# Altium PCB PS3604LF.PcbDoc (part 1 of 2)
Units mm, origin at the board's own origin, x right, y up, seen from the top; angles counter-clockwise.
Board outline 115 x 36 mm, 2 copper layers (Top Layer, Bottom Layer), stack 1.571 mm thick; 93 components, 88 nets, 378 pads, 83 vias.
Unrouted connection lines stored in the file: 6.
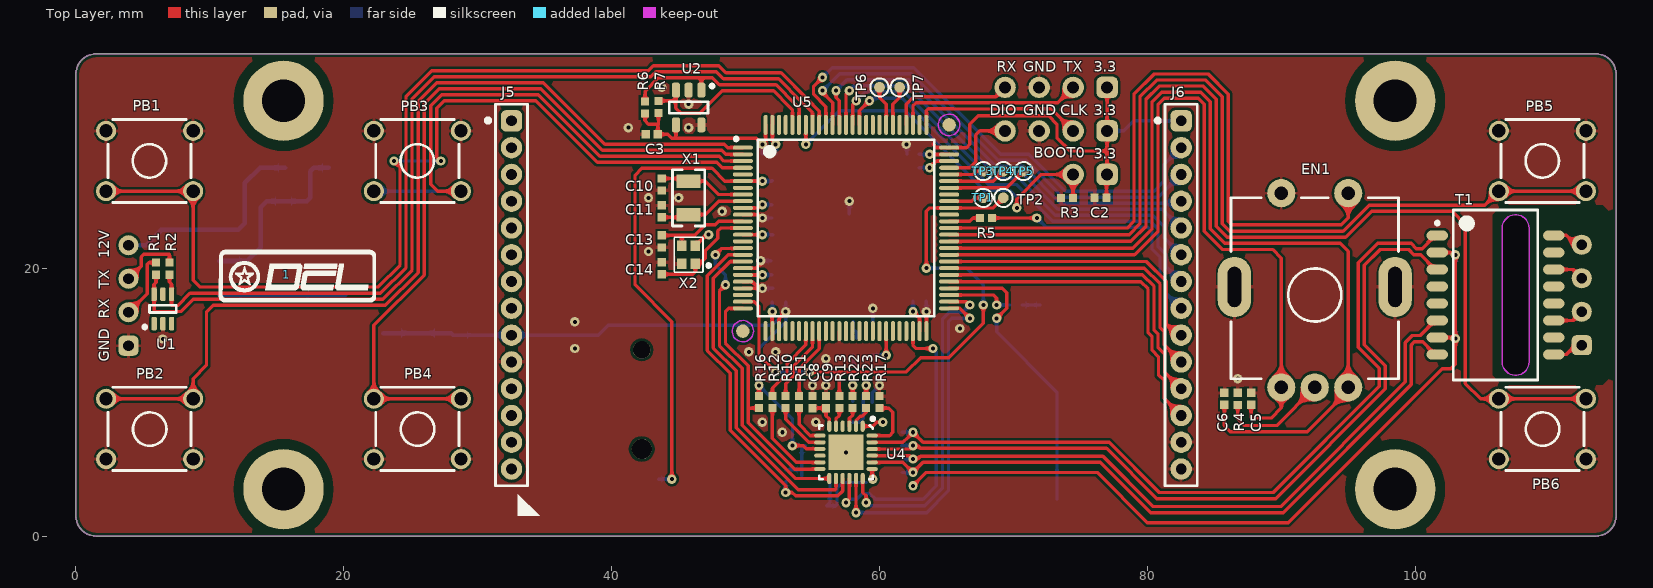
[diagram p0: Top Layer view]
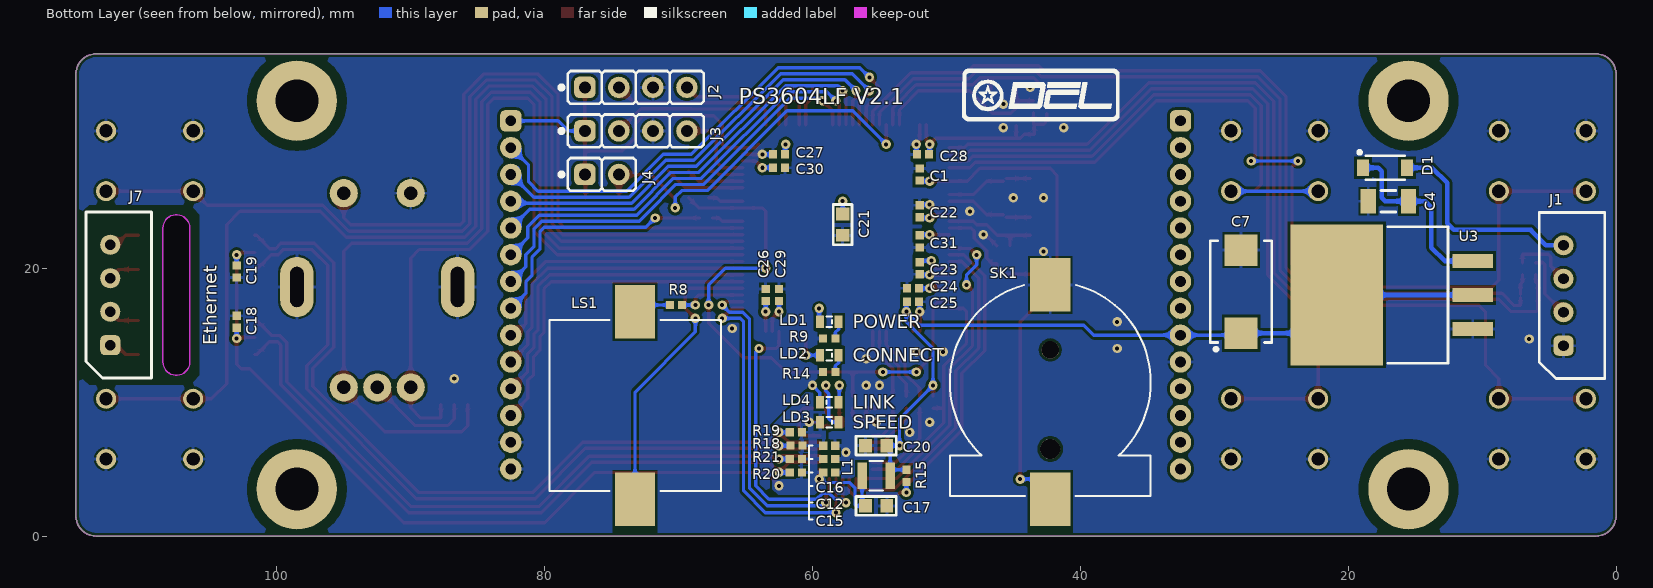
[diagram p1: Bottom Layer view, seen from below]

## Layer stack, top to bottom
Top Solder: solder mask 0.0102, Solder Resist, Dk 3.5
Top Layer: signal copper 0.0356
Dielectric 1: dielectric 1.5, FR-4, Dk 4.8
Bottom Layer: signal copper 0.0356
Bottom Solder: solder mask 0.0102, Solder Resist, Dk 3.5

## Board outline
0,1.5 0,34.5 cw(c1.5,34.5) 1.5,36 113.5,36 cw(c113.5,34.5) 115,34.5 115,1.5 cw(c113.5,1.5) 113.5,0 1.5,0 cw(c1.5,1.5)
cut-out: 106.5,13 ccw(c107.5,13) 108.5,13 108.5,23 ccw(c107.5,23) 106.5,23

## Design rules (kind name [scope] priority, off if disabled: settings)
Clearance Clearance_DIFF100_HV [InNetClass('DIFF100_HV') vs not InNetClass('DIFF100_HV')] p1: gap=0.5 ignorepadtopadclearanceinfootprint=FALSE
Clearance Clearance_MHKeepOut [(ObjectKind = 'Pad') And (AsMM(PadXSize_AllLayers) = 6) vs OnLayer('Keep-Out Layer')] p2: gap=0.2 ignorepadtopadclearanceinfootprint=FALSE except(0: Arc-Hole Track-Hole SMDPad-Hole THPad-Hole Via-Hole Fill-Hole Poly-Hole Region-Hole Text-Hole)
Clearance Clearance_MH [(ObjectKind = 'Pad') And (AsMM(PadXSize_AllLayers) = 6)] p3: gap=0.75 ignorepadtopadclearanceinfootprint=FALSE except(0: Arc-Hole Track-Hole SMDPad-Hole THPad-Hole Via-Hole Fill-Hole Poly-Hole Region-Hole Text-Hole)
Clearance [All] p4: gap=0.2 ignorepadtopadclearanceinfootprint=FALSE except(0: Arc-Hole Track-Hole SMDPad-Hole THPad-Hole Via-Hole Fill-Hole Poly-Hole Region-Hole Text-Hole)
DiffPairsRouting DiffPair_DIFF100DiffPairsRouting [InDifferentialPairClass('DIFF100') or InDifferentialPairClass('DIFF100_HV')] p1: maxlimit=0.3 minlimit=0.2 mostfreqgap=0.25 toplayer_minwidth=0.25 toplayer_maxwidth=0.25 toplayer_prefwidth=0.25 bottomlayer_minwidth=0.25 bottomlayer_maxwidth=0.25 bottomlayer_prefwidth=0.25 maxuncoupledlength=12
Height [All] p1: minheight=0 maxheight=30 prefheight=12.7
HoleSize [All] p1: absolutevalues=TRUE maxlimit=4 minlimit=0.3 maxpercent=80.000 minpercent=20.000
MinimumSolderMaskSliver [All] p1: minsoldermaskwidth=0.1
PolygonConnect [All] p1: thpad.connectstyle=Relief thpad.reliefconductorwidth=0.25 thpad.reliefentries=4 thpad.polygonreliefangle="90 Angle" thpad.airgapwidth=0.15 smdpad.connectstyle=Relief smdpad.reliefconductorwidth=0.25 smdpad.reliefentries=4 smdpad.polygonreliefangle="90 Angle" smdpad.airgapwidth=0.15 via.connectstyle=Direct via.reliefconductorwidth=0.25 via.reliefentries=4 via.polygonreliefangle="90 Angle" via.airgapwidth=0.15
RoutingCorners [All] p1: cornerstyle=45-Degree minsetback=2 maxsetback=2
RoutingVias [All] p1: holewidth=0.5 width=1 viastyle="Through Hole" minholewidth=0.3 minwidth=0.5 maxholewidth=0.5 maxwidth=1
SilkToSilkClearance [All] p1: silktosilkclearance=0
SilkToSolderMaskClearance [IsPad] p1: minsilkscreentomaskgap=0.1 clearancetoexposedcopper=TRUE
SolderMaskExpansion [All] p1: expansion=0.05 istentingtop=FALSE
Width DiffPair_DIFF100Width [InDifferentialPairClass('DIFF100') or InDifferentialPairClass('DIFF100_HV')] p1: maxlimit=0.25 minlimit=0.25 preferedwidth=0.25 minimp=50.000000 maximp=50.000000 favimp=100.000000
Width [All] p2: maxlimit=3 minlimit=0.2 preferedwidth=0.25
23 further rules are at their usual default settings.

## Classes and differential pairs
net class DIFF100: RD_N RD_P TD_N TD_P
net class DIFF100_HV: RX_N RX_P TX_N TX_P
differential pair TD: +TD_P -TD_N
differential pair RD: +RD_P -RD_N
differential pair RX: +RX_P -RX_N
differential pair TX: +TX_P -TX_N

## Components (designator, comment, footprint, x,y, rotation, side; value= is the part's Value field where it differs from the comment)
1 "" logo_2 15.75,19.5 r0 top
C1 "100n" CAPC1005X55N 52,27 r270 bottom
C2 "100n" CAPC1005X55N 76.5,25.25 r0 top
C3 "100n" CAPC1005X55N 43,30 r0 top
C4 "22u" CAPC3216X100N 17,25 r180 bottom
C5 "10n" CAPC1005X55N 87.75,10.25 r270 top
C6 "10n" CAPC1005X55N 85.75,10.25 r270 top
C7 "330u" CAPMP7343X310N 28,18.25 r90 bottom
C8 "470p" CAPC1005X55N 55,10 r270 top
C9 "2.2u" CAPC1005X55N 56,10 r270 top
C10 "15p" CAPC1005X55N 43.75,26.25 r90 top
C11 "15p" CAPC1005X55N 43.75,24.25 r270 top
C12 "22n" CAPC1005X55N 58.75,5.75 r180 bottom
C13 "6.8p" CAPC1005X55N 43.75,22 r90 top
C14 "6.8p" CAPC1005X55N 43.75,20 r270 top
C15 "100n" CAPC1005X55N 58.75,4.75 r0 bottom
C16 "100n" CAPC1005X55N 58.75,6.75 r0 bottom
C17 "4.7u" CAPC1608X87N 55.25,2.25 r0 bottom
C18 "22n" CAPC1005X55N 103,16 r90 bottom
C19 "22n" CAPC1005X55N 103,19.75 r270 bottom
C20 "4.7u" CAPC1608X87N 55.25,6.75 r180 bottom
C21 "4.7u" CAPC1608X87N 57.75,23.25 r90 bottom
C22 "100n" CAPC1005X55N 52,24.25 r270 bottom
C23 "100n" CAPC1005X55N 52,20 r90 bottom
C24 "100n" CAPC1005X55N 52.5,18.5 r180 bottom
C25 "100n" CAPC1005X55N 52.5,17.5 r0 bottom
C26 "100n" CAPC1005X55N 63.5,18 r270 bottom
C27 "100n" CAPC1005X55N 62.5,28.5 r180 bottom
C28 "100n" CAPC1005X55N 51.75,28.5 r180 bottom
C29 "2.2u" CAPC1005X55N 62.5,18 r270 bottom
C30 "2.2u" CAPC1005X55N 62.5,27.5 r0 bottom
C31 "100n" CAPC1005X55N 52,22 r90 bottom
D1 "MBR140SFT1G" SOD-123FL 17.25,27.5 r180 bottom
EN1 "PEC11R-4220F-S0024" EN_BOURNS_PEC11R-4x20F-Sxxxx 92.5,18 r0 top
J1 "SPOX" MOLEX_22-03-5045 3.991,17.961 r90 bottom
J2 "Header 4" 3M_2304-6111-TG 77,33.5 r180 bottom
J3 "Header 4" 3M_2304-6111-TG 77,30.25 r180 bottom
J4 "Header 2" 3M_2302-6111-TG 77,27 r180 bottom
J5 "Socket 14" 3M_955114-6102-AR 32.5,18 r270 top
J6 "Socket 14" 3M_955114-6102-AR 82.5,18 r270 top
J7 "SPOX" MOLEX_22-03-5045 112.5,18 r90 bottom
L1 "2.2uH" INDC2520X100N 55.25,4.5 r180 bottom
LD1 "Red" LEDC1608X80N_RED 58.75,16 r0 bottom
LD2 "Blue" LEDC1608X80N_BLUE 58.75,13.5 r0 bottom
LD3 "Yellow" LEDC1608X80N_YELLOW 58.75,8.5 r0 bottom
LD4 "Green" LEDC1608X80N_GREEN 58.75,10 r180 bottom
LS1 "Piezo" HPS13C 73.25,9.75 r180 bottom
PB1 "Push Button" PB_E-SWITCH_TL1105HF100Q 5.5,28 r0 top
PB2 "Push Button" PB_E-SWITCH_TL1105HF100Q 5.5,8 r180 top
PB3 "Push Button" PB_E-SWITCH_TL1105HF100Q 25.5,28 r0 top
PB4 "Push Button" PB_E-SWITCH_TL1105HF100Q 25.5,8 r180 top
PB5 "Push Button" PB_E-SWITCH_TL1105HF100Q 109.5,28 r0 top
PB6 "Push Button" PB_E-SWITCH_TL1105HF100Q 109.5,8 r180 top
R1 "100" RESC1005X40N 5.991,19.961 r270 top
R2 "100" RESC1005X40N 6.991,19.961 r270 top
R3 "1k" RESC1005X40N 74,25.25 r180 top
R4 "100" RESC1005X40N 86.75,10.25 r270 top
R5 "100" RESC1005X40N 67.95,23.75 r180 top
R6 "2k" RESC1005X40N 42.5,32 r270 top
R7 "2k" RESC1005X40N 43.5,32.05 r270 top
R8 "270" RESC1005X40N 70.195,17.25 r180 bottom
R9 "1k" RESC1005X40N 58.75,14.75 r0 bottom
R10 "10" RESC1005X40N 53,10 r270 top
R11 "10" RESC1005X40N 54,10 r270 top
R12 "10" RESC1005X40N 52,10 r270 top
R13 "100" RESC1005X40N 57,10 r270 top
R14 "1k" RESC1005X40N 58.75,12.25 r0 bottom
R15 "1k5" RESC1005X40N 53,4.5 r90 bottom
R16 "2k" RESC1005X40N 51,10 r90 top
R17 "12k" RESC1005X40N 60,10 r90 top
R18 "49R9" RESC1005X40N 61.2,6.75 r180 bottom
R19 "49R9" RESC1005X40N 61.25,7.75 r180 bottom
R20 "49R9" RESC1005X40N 61.25,4.75 r180 bottom
R21 "49R9" RESC1005X40N 61.25,5.75 r180 bottom
R22 "4k7" RESC1005X40N 58,10 r90 top
R23 "270" RESC1005X40N 59,10 r90 top
SK1 "BH500" EEMB_BH500 42.25,11.5 r90 bottom
T1 "LF-H84P-1" XFMR_LF-H84P 106,18 r0 top
TP1 "Test Point" TP_SMD_800 67.75,25.25 r90 top
TP2 "Test Point" TP_SMD_800 69.25,25.25 r90 top
TP3 "Test Point" TP_SMD_800 67.75,27.25 r90 top
TP4 "Test Point" TP_SMD_800 69.25,27.25 r90 top
TP5 "Test Point" TP_SMD_800 70.75,27.25 r90 top
TP6 "Test Point" TP_SMD_800 60,33.5 r90 top
TP7 "Test Point" TP_SMD_800 61.5,33.5 r90 top
U1 "NUP4202" SOT65P220X110-6N 6.491,16.961 r90 top
U2 "24AA08" SOT95P280X145-5N 45.75,32 r270 top
U3 "LM1086IS-3.3" TO254P1435X464-4N-R1041X635 16.75,18 r0 bottom
U4 "LAN8720" QFN50P400X400X100-25N-S265 57.5,6.25 r270 top
U5 "STM32F407VET6" QFP50P1600X1600X160-100N 57.5,23 r0 top locked
X1 "32.768KHZ" OSCCC150X320X80-2N 45.75,25.25 r90 top
X2 "24MHZ" OSCCC160X200X65-4N 45.75,21 r180 top
? "" logo_2 43.75,33 r180 bottom

## Footprints (in the part's own frame and the unit in brackets; to place one, negate y for a bottom-side part, rotate by r counter-clockwise, add the part's x,y. Pads: shape width x height; smd on the part's side, far side on the other; paste and mask are expansions set on the pad)
3M_2302-6111-TG [mm] "4 Contacts Straight Strip Header Pitch 2.54mm L=5.8mm ''Mini-Wire-Wrap''"
  rrect50% 1.6x1.6 hole 0.9: 1(0,0)
  round 1.6 hole 0.9: 2(2.54,0)
  silkscreen extent -1.9,-1.23 3.81,1.23, body extent -1.29,-1.21 3.79,1.28, height 8.54
3M_2304-6111-TG [mm] "4 Contacts Straight Strip Header Pitch 2.54mm L=5.8mm ''Mini-Wire-Wrap''"
  rrect50% 1.6x1.6 hole 0.9: 1(0,0)
  round 1.6 hole 0.9: 2(2.54,0) 3(5.08,0) 4(7.62,0)
  silkscreen extent -1.9,-1.23 8.89,1.23, body extent -1.29,-1.21 8.87,1.28, height 8.54
3M_955114-6102-AR [mm] "2 mm Straight, Solder Tail"
  rrect50% 1.6x1.6 hole 0.8: 1(-13,0.025)
  round 1.6 hole 0.8: 2(-11,0.025) 3(-9,0.025) 4(-7,0.025) 5(-5,0.025) 6(-3,0.025) 7(-1,0.025) 8(1,0.025) 9(3,0.025) 10(5,0.025) 11(7,0.025) 12(9,0.025) 13(11,0.025) 14(13,0.025)
  silkscreen extent -14.25,-1.87 14.25,1.23, body extent -14.25,-1.18 14.25,1.23, height 4
CAPC1005X55N [mm] "Chip Capacitor, Body 1.0x0.55mm, IPC Medium Density"
  rect 0.62x0.62 smd: 1(-0.45,0) 2(0.45,0)
  body extent -0.52,-0.27 0.53,0.28, height 0.55
CAPC1608X87N [mm] "Chip Capacitor, Body 1.6x0.8mm IPC Medium Density"
  rect 0.95x1 smd: 1(-0.8,0) 2(0.8,0)
  silkscreen extent -1.5,-0.7 1.5,0.7, body extent -0.87,-0.47 0.88,0.48, height 0.87
CAPC3216X100N [mm] "Chip Capacitor, Body 3.2x1.6mm, IPC Medium Density"
  rect 1.15x1.8 smd: 1(-1.5,0) 2(1.5,0)
  silkscreen extent -0.55,-0.8 0.55,0.8, body extent -1.7,-0.9 1.7,0.9, height 0.94
CAPMP7343X310N [mm] "Capacitor, Polarized, Molded  Body 7.3x4.3mm, IPC Medium Density"
  rect 2.35x2.45 smd: 1(-3.1,0) 2(3.1,0)
  silkscreen extent -4.42,-2.3 3.8,2.3, body extent -3.8,-2.3 3.8,2.3, height 3.1
EEMB_BH500 [mm] "Battery holder for coin-type Lithium Battery  BH500(ForLIR/CR1216,1220,1225)"
  rect 4x3 smd: 1(-8.75,0) 2(7.25,0)
  round 1.3 hole 1.3 unplated: MH1(2.4,0)
  round 1.5 hole 1.5 unplated: MH2(-5,0)
  silkscreen extent -8.5,-7.5 7.24,7.5, body extent -10.3,-7.37 8.9,7.37, height 4.35
EN_BOURNS_PEC11R-4x20F-Sxxxx [mm] "PEC11R Series - 12 mm Incremental Encoder"
  round 2.1 hole 1: A(-2.5,-6.9) B(2.5,-6.9) C(0,-6.9) S1(-2.5,7.6) S2(2.5,7.6)
  oval 2.5x4.5 hole 1 slot 3 at 90 deg: SH1(-6,0.6) SH2(6,0.6)
  silkscreen extent -6.25,-6.25 6.25,7.25, body extent -7,-7.2 7,7.7, height 26.6
HPS13C [mm] "12.8 x 12.8 mm PIEZO SOUND GENERATORS"
  rect 3x4 smd: 1(0,-7) 2(0,7)
  silkscreen extent -6.4,-6.4 6.4,6.4, body extent -6.4,-8.4 6.4,8.4, height 2.5
INDC2520X100N [mm] "Chip Inductor, EIA 1008, Metric 2520, 2.50mm L X 2mm W, IPC Medium Density"
  rect 0.7x2 smd: 1(-1.05,0) 2(1.05,0)
  silkscreen extent -0.5,-1.1 0.5,1.1, body extent -1.33,-1.07 1.33,1.07, height 1
LEDC1608X80N_BLUE [mm] "Chip BLUE LED, 2-Leads, Body 1.6x0.8mm, IPC Medium Density"
  rect 0.6x0.95 smd: 1(-0.7,0) 2(0.7,0)
  silkscreen extent -0.2,-0.4 0.2,0.4, body extent -0.8,-0.4 0.8,0.4, height 0.6
LEDC1608X80N_GREEN [mm] "Chip GREEN LED, 2-Leads, Body 1.6x0.8mm, IPC Medium Density"
  rect 0.6x0.95 smd: 1(-0.7,0) 2(0.7,0)
  silkscreen extent -0.2,-0.4 0.2,0.4, body extent -0.8,-0.4 0.8,0.4, height 0.6
LEDC1608X80N_RED [mm] "Chip RED LED, 2-Leads, Body 1.6x0.8mm, IPC Medium Density"
  rect 0.6x0.95 smd: 1(-0.7,0) 2(0.7,0)
  silkscreen extent -0.2,-0.4 0.2,0.4, body extent -0.8,-0.4 0.8,0.4, height 0.6
LEDC1608X80N_YELLOW [mm] "Chip YELLOW LED, 2-Leads, Body 1.6x0.8mm, IPC Medium Density"
  rect 0.6x0.95 smd: 1(-0.7,0) 2(0.7,0)
  silkscreen extent -0.2,-0.4 0.2,0.4, body extent -0.8,-0.4 0.8,0.4, height 0.6
logo_2 [mm]
  silkscreen extent -5.08,-2.02 6.65,1.86
MOLEX_22-03-5045 [mm] "4.9 x 12.4 x 5.9, 2.50mm Pitch SPOX Wire-to-Board Header, Vertical, Shrouded, 4 Circuits, Tin (Sn) Plating"
  rrect50% 1.5x1.5 hole 0.8: 1(-3.75,-0.065)
  round 1.5 hole 0.8: 2(-1.25,-0.065) 3(1.25,-0.065) 4(3.75,-0.065)
  silkscreen extent -6.2,-3.15 6.2,1.75, body extent -6.2,-3.12 6.2,1.78, height 5.95
OSCCC150X320X80-2N [mm] "Oscillator, corner concave; 2 pin, 3.20mm L X 1.50mm W X 0.80mm H, IPC Medium Density"
  rect 1x1.8 smd: 1(-1.25,0) 2(1.25,0)
  silkscreen extent -2.1,-1.2 2.1,1.2, body extent -1.6,-0.75 1.6,0.75, height 0.71
OSCCC160X200X65-4N [mm] "Oscillator, corner concave; 4 pin, 2.00mm L X 1.60mm W X 0.65mm H, IPC Medium Density"
  rect 0.7x0.8 smd: 1(-0.5,0.675) 2(-0.5,-0.675) 3(0.5,-0.675) 4(0.5,0.675)
  silkscreen extent -1.63,-1.3 1.07,1.3, body extent -0.8,-1 0.8,1, height 0.65
PB_E-SWITCH_TL1105HF100Q [mm] "6x6mm Model, Horizontal, Flat Plunger Type (without Ground Terminal) Pushbutton Switch, OMRON B3F Series"
  round 1.5 hole 1: 1(-3.25,2.25) 2(3.25,2.25) 3(-3.25,-2.25) 4(3.25,-2.25)
  silkscreen extent -3.1,-3.1 3.1,3.1, body extent -3.95,-3 3.95,3, height 12.51
QFN50P400X400X100-25N-S265 [mm] "QFN,0.50mm pitch,square;6 pin X 6 pin,4.0mm X 4.0mm X 1.00mm H body (w/thermal tab 2.65 X 2.65mm),  IPC Medium Density"
  oval 0.85x0.3 smd: 1(-1.95,1.25) 2(-1.95,0.75) 3(-1.95,0.25) 4(-1.95,-0.25) 5(-1.95,-0.75) 6(-1.95,-1.25) 13(1.95,-1.25) 14(1.95,-0.75) 15(1.95,-0.25) 16(1.95,0.25) 17(1.95,0.75) 18(1.95,1.25)
  oval 0.3x0.85 smd: 7(-1.25,-1.95) 8(-0.75,-1.95) 9(-0.25,-1.95) 10(0.25,-1.95) 11(0.75,-1.95) 12(1.25,-1.95) 19(1.25,1.95) 20(0.75,1.95) 21(0.25,1.95) 22(-0.25,1.95) 23(-0.75,1.95) 24(-1.25,1.95)
  rect 2.65x2.65 smd: 25(0,0)
  silkscreen extent -2.62,-2 2,2.13, body extent -2.07,-2.07 2.08,2.08, height 1
QFP50P1600X1600X160-100N [mm] "QFP, 0.50mm Pitch, Square; 100 Pin,14.00mm L X 14.00mm W X 1.60mm H Body, IPC Medium Density"
  oval 1.5x0.3 smd: 1(-7.7,6) 2(-7.7,5.5) 3(-7.7,5) 4(-7.7,4.5) 5(-7.7,4) 6(-7.7,3.5) 7(-7.7,3) 8(-7.7,2.5) 9(-7.7,2) 10(-7.7,1.5) 11(-7.7,1) 12(-7.7,0.5) 13(-7.7,0) 14(-7.7,-0.5) 15(-7.7,-1) 16(-7.7,-1.5) 17(-7.7,-2) 18(-7.7,-2.5) 19(-7.7,-3) 20(-7.7,-3.5) 21(-7.7,-4) 22(-7.7,-4.5) 23(-7.7,-5) 24(-7.7,-5.5) 25(-7.7,-6) 51(7.7,-6) 52(7.7,-5.5) 53(7.7,-5) 54(7.7,-4.5) 55(7.7,-4) 56(7.7,-3.5) 57(7.7,-3) 58(7.7,-2.5) 59(7.7,-2) 60(7.7,-1.5) 61(7.7,-1) 62(7.7,-0.5) 63(7.7,0) 64(7.7,0.5) 65(7.7,1) 66(7.7,1.5) 67(7.7,2) 68(7.7,2.5) 69(7.7,3) 70(7.7,3.5) 71(7.7,4) 72(7.7,4.5) 73(7.7,5) 74(7.7,5.5) 75(7.7,6)
  oval 0.3x1.5 smd: 26(-6,-7.7) 27(-5.5,-7.7) 28(-5,-7.7) 29(-4.5,-7.7) 30(-4,-7.7) 31(-3.5,-7.7) 32(-3,-7.7) 33(-2.5,-7.7) 34(-2,-7.7) 35(-1.5,-7.7) 36(-1,-7.7) 37(-0.5,-7.7) 38(0,-7.7) 39(0.5,-7.7) 40(1,-7.7) 41(1.5,-7.7) 42(2,-7.7) 43(2.5,-7.7) 44(3,-7.7) 45(3.5,-7.7) 46(4,-7.7) 47(4.5,-7.7) 48(5,-7.7) 49(5.5,-7.7) 50(6,-7.7) 76(6,7.7) 77(5.5,7.7) 78(5,7.7) 79(4.5,7.7) 80(4,7.7) 81(3.5,7.7) 82(3,7.7) 83(2.5,7.7) 84(2,7.7) 85(1.5,7.7) 86(1,7.7) 87(0.5,7.7) 88(0,7.7) 89(-0.5,7.7) 90(-1,7.7) 91(-1.5,7.7) 92(-2,7.7) 93(-2.5,7.7) 94(-3,7.7) 95(-3.5,7.7) 96(-4,7.7) 97(-4.5,7.7) 98(-5,7.7) 99(-5.5,7.7) 100(-6,7.7)
  round 1 smd paste-0.51 mask+0.5: FTG1(-7.7,-7.7) FTG2(7.7,7.7)
  Top Layer keep-out circle w0.1: c-7.7,-7.7 r0.8
  Top Layer keep-out circle w0.1: c7.7,7.7 r0.8
  silkscreen extent -8.32,-6.6 6.6,6.77, body extent -8.02,-8.02 8.02,8.02, height 1.6
RESC1005X40N [mm] "Chip Resistor, EIA 0402, Metric 1005, Body 1.0x0.5mm, IPC Medium Density"
  rect 0.6x0.6 smd: 1(-0.45,0) 2(0.45,0)
  body extent -0.52,-0.27 0.53,0.28, height 0.4
SOD-123FL [mm] "Small Outline Diode Flat Lead (SOD-123FL), Body; 2.70mm L X 1.65mm W X 1.0mm H"
  rect 0.91x1.22 smd: 1(-1.64,0) 2(1.64,0)
  silkscreen extent -2.03,-0.9 1.45,1.27, body extent -1.75,-0.9 1.75,0.9, height 1
SOT65P220X110-6N [mm] "SOT363, 0.65mm pitch; 6 pin, 1.25mm W X 2mm L, IPC Medium Density"
  rrect50% 1x0.4 smd: 1(-1.1,0.65) 2(-1.1,0) 3(-1.1,-0.65) 4(1.1,-0.65) 5(1.1,0) 6(1.1,0.65)
  silkscreen extent -1.47,-1 0.28,1.47, body extent -1.2,-1.1 1.2,1.1, height 1.1
SOT95P280X145-5N [mm] "SOT, 0.95mm pitch; 5 pin, 1.60mm W X 2.90mm L X 1.45mm H body, IPC Medium Density"
  rrect50% 1.1x0.6 smd: 1(-1.3,0.95) 2(-1.3,0) 3(-1.3,-0.95) 4(1.3,-0.95) 5(1.3,0.95)
  silkscreen extent -1.72,-1.45 0.43,1.88, body extent -1.4,-1.5 1.4,1.5, height 1.45
TO254P1435X464-4N-R1041X635 [mm] "TO-263, TO, 2.54mm pitch; 3 pin,14.35mm L X 8.64mm W X 4.64mm H body IPC Medium Density"
  rect 3x1.05 smd: 1(-6.05,2.54) 2(-6.05,0) 3(-6.05,-2.54)
  rect 6.9x10.5 smd: 4(4.1,0)
  silkscreen extent -4.2,-5.1 0.3,5.1, body extent -7.11,-5.2 7.24,5.21, height 4.64
TP_SMD_800 [mm]
  round 0.8 smd: 1(0,0)
  silkscreen extent -0.68,-0.68 0.68,0.68
XFMR_LF-H84P [mm] "16-Leads, Body 12,70x7,11mm, Pitch 1,27mm, IPC Medium Density"
  oval 1.6x0.75 smd: 1(-4.35,4.445) 2(-4.35,3.175) 3(-4.35,1.905) 4(-4.35,0.635) 5(-4.35,-0.635) 6(-4.35,-1.905) 7(-4.35,-3.175) 8(-4.35,-4.445) 9(4.35,-4.445) 10(4.35,-3.175) 11(4.35,-1.905) 12(4.35,-0.635) 13(4.35,0.635) 14(4.35,1.905) 15(4.35,3.175) 16(4.35,4.445)
  silkscreen extent -4.47,-6.35 3.15,6.35, body extent -4.76,-6.4 4.75,6.3, height 2.14

## Part data
C1 C2 C3 C15 C16 C22 C23 C24 C25 C26 C27 C28 C31: library part CC0402_100NF_50V_10%_X7R, "Non-polarised capacitor", Case=0402, Manufacturer=GENERIC, Manufacturer1 ComponentHeight=0.55mm, Manufacturer1 Example=HITANO, Manufacturer1 Part Number=C0402B104K500NU, Tolerance=±10%, Voltage=50V, Author=DEL, Component Type=Standard, CreateDate=13.11.2017, LatestRevisionDate=13.11.2017, Manufacturer Part Number=CC0402_100NF_50V_10%_X7R, Mounted=Yes, Part Description="SMD Multilayer Chip Ceramic Capacitor", Part Number=CC0402_100NF_50V_10%_X7R, Pin Count=2, SMD=Yes, Socket=No, Status="Not Recommended", TC=X7R
C4: library part CC1206_22UF_16V_20%_X5R, "Non-polarised capacitor", Case=1206, Manufacturer=GENERIC, Manufacturer1 ComponentHeight=1mm, Manufacturer1 Example=Samsung, Manufacturer1 Part Number=CL31A226MOCLNNC, Tolerance=±20%, Voltage=16V, Author=D_EL, Component Type=Standard, CreateDate=13.06.2017, LatestRevisionDate=13.06.2017, Manufacturer Part Number=CC1206_22UF_16V_20%_X5R, Mounted=Yes, Part Description="SMD Multilayer Chip Ceramic Capacitor", Part Number=CC1206_22UF_16V_20%_X5R, Pin Count=2, SMD=Yes, Socket=No, Status=Preferred, TC=X5R
C5 C6: library part CC0402_10NF_50V_10%_X7R, "Non-polarised capacitor", Case=0402, Manufacturer=GENERIC, Manufacturer1 ComponentHeight=0.55mm, Manufacturer1 Example=KEMET, Manufacturer1 Part Number=C0402C103K5RACTU, Tolerance=±10%, Voltage=50V, Author=DEL, Component Type=Standard, CreateDate=19.12.2017, LatestRevisionDate=19.12.2017, Manufacturer Part Number=CC0402_10NF_50V_10%_X7R, Mounted=Yes, Part Description="SMD Multilayer Chip Ceramic Capacitor", Part Number=CC0402_10NF_50V_10%_X7R, Pin Count=2, SMD=Yes, Socket=No, Status=None, TC=X7R
C7: library part CTE7343-31_330UF_6.3V_20%_LESR0025_KEMET_T520, "Polarised capacitor", Case=D, Manufacturer=KEMET, Manufacturer Part Number=T520D337M006ATE025, Tolerance=±20%, Voltage=6.3V, Author="CERN DEM JLC", ComponentHeight=3.1mm, Component Type=Standard, CreateDate=20.10.2010, HelpURL=\\cern.ch\dfs\Applications\Altium\Datasheets\CTE-LESR_KEMET_T520.pdf, LatestRevisionDate=20.10.2010, Mounted=Yes, Part Description="Low ESR 0R025 Tantalum Chip Capacitor", Part Number=CTE7343-31_330UF_6.3V_20%_LESR0025_KEMET_T520, Pin Count=2, SMD=Yes, Socket=No, Status=None
C8: library part CC0402_470PF_50V_10%_X7R, "Non-polarised capacitor", Case=0402, Manufacturer=GENERIC, Manufacturer1 ComponentHeight=0.55mm, Manufacturer1 Example=PHYCOMP, Manufacturer1 Part Number=223858715618, Tolerance=±10%, Voltage=50V, Author="CERN DEM JLC", Component Type=Standard, CreateDate=03.12.2007, HelpURL=\\cern.ch\dfs\Applications\Altium\Datasheets\CC0402_NP0_PHYCOMP.pdf, LatestRevisionDate=03.12.2007, Manufacturer Part Number=CC0402_470PF_50V_10%_X7R, Mounted=Yes, Part Description="SMD Multilayer Chip Ceramic Capacitor", Part Number=CC0402_470PF_50V_10%_X7R, Pin Count=2, SMD=Yes, Socket=No, Status="Not Recommended", TC=X7R
C9 C29 C30: library part CC0402_2.2UF_6.3V_20%_X5R, "Non-polarised capacitor", Case=0402, Manufacturer=GENERIC, Manufacturer1 ComponentHeight=0.55mm, Tolerance=±20%, Voltage=6.3V, Author=ELMAN, Component Type=Standard, CreateDate=19.05.2015, HelpURL=\\cern.ch\dfs\Applications\Altium\Datasheets\CC0402_X5R_KEMET.pdf, LatestRevisionDate=19.05.2015, Manufacturer Part Number=CC0402_2.2UF_6.3V_20%_X5R, Mounted=Yes, Part Description="SMD Multilayer Chip Ceramic Capacitor", Part Number=CC0402_2.2UF_6.3V_20%_X5R, Pin Count=2, SMD=Yes, Socket=No, Status=Preferred, TC=X5R
C10 C11: library part CC0402_15PF_50V_5%_NP0, "Non-polarised capacitor", Case=0402, Manufacturer=GENERIC, Manufacturer1 ComponentHeight=0.55mm, Manufacturer1 Example=PHYCOMP, Manufacturer1 Part Number=223886915159, Tolerance=±5%, Voltage=50V, Author="CERN DEM JLC", Component Type=Standard, CreateDate=03.12.2007, HelpURL=\\cern.ch\dfs\Applications\Altium\Datasheets\CC0402_NP0_PHYCOMP.pdf, LatestRevisionDate=03.12.2007, Manufacturer Part Number=CC0402_15PF_50V_5%_NP0, Mounted=Yes, Part Description="SMD Multilayer Chip Ceramic Capacitor", Part Number=CC0402_15PF_50V_5%_NP0, Pin Count=2, SMD=Yes, Socket=No, Status="Not Recommended", TC=NP0
C12 C18 C19: library part CC0402_22NF_16V_10%_X7R, "Non-polarised capacitor", Case=0402, Manufacturer=GENERIC, Manufacturer1 ComponentHeight=0.55mm, Manufacturer1 Example=PHYCOMP, Manufacturer1 Part Number=223878715641, Tolerance=±10%, Voltage=16V, Author="CERN DEM JLC", Component Type=Standard, CreateDate=03.12.2007, HelpURL=\\cern.ch\dfs\Applications\Altium\Datasheets\CC0402_X7R_PHYCOMP.pdf, LatestRevisionDate=03.12.2007, Manufacturer Part Number=CC0402_22NF_16V_10%_X7R, Mounted=Yes, Part Description="SMD Multilayer Chip Ceramic Capacitor", Part Number=CC0402_22NF_16V_10%_X7R, Pin Count=2, SMD=Yes, Socket=No, Status="Not Recommended", TC=X7R
C13 C14: library part CC0402_6.8PF_50V_0.5PF_NP0, "Non-polarised capacitor", Case=0402, Manufacturer=GENERIC, Manufacturer1 ComponentHeight=0.55mm, Manufacturer1 Example=PHYCOMP, Manufacturer1 Part Number=223886915688, Tolerance=±0.5pF, Voltage=50V, Author="CERN DEM JLC", Component Type=Standard, CreateDate=03.12.2007, HelpURL=\\cern.ch\dfs\Applications\Altium\Datasheets\CC0402_NP0_PHYCOMP.pdf, LatestRevisionDate=03.12.2007, Manufacturer Part Number=CC0402_6.8PF_50V_0.5PF_NP0, Mounted=Yes, Part Description="SMD Multilayer Chip Ceramic Capacitor", Part Number=CC0402_6.8PF_50V_0.5PF_NP0, Pin Count=2, SMD=Yes, Socket=No, Status="Not Recommended", TC=NP0
C17 C20 C21: library part CC0603_4.7UF_10V_10%_X5R, "Non-polarised capacitor", Case=0603, Manufacturer=GENERIC, Manufacturer1 ComponentHeight=0.95mm, Manufacturer1 Example=TDK, Manufacturer1 Part Number=C1608X5R1A475K080AC, Manufacturer Part Number=CC0603_4.7uF_10V_10%_X5R, Tolerance=±10%, Voltage=10V, Author=ELMAN, Component Type=Standard, CreateDate=13.11.2016, LatestRevisionDate=13.11.2016, Mounted=Yes, Part Description="SMD Multilayer Chip Ceramic Capacitor", Part Number=CC0603_4.7UF_10V_10%_X5R, Pin Count=2, SMD=Yes, Socket=No, Status=Preferred, TC=X5R
D1: "Schottky Diode", Case=SOD-123FL, Manufacturer="ON SEMICONDUCTOR", Power=1A, Voltage=40V, Author="CERN DEM JLC", ComponentHeight=1.0mm, Component Type=Standard, CreateDate=06.04.2009, Device=MBR140SFT1G, HelpURL=\\cern.ch\dfs\Applications\Altium\Datasheets\MBR140SFT1G.pdf, LatestRevisionDate=06.04.2009, Manufacturer Part Number=MBR140SFT1G, Mounted=Yes, PackageDescription="Small Outline Diode Flat Lead (SOD-123FL), Body; 2.70mm L X 1.65mm W X 1.0mm H", Part Description="Schottky Power Rectifier", Part Number=MBR140SFT1G, Pin Count=2, SMD=Yes, Socket=No
EN1: library part EN_BOUNCE_PEC11R-4220F-S0024, "Encoder incremental with push momentary switch", Manufacturer=BOURNS, Author=DEL, ComponentHeight=26.5mm, Component Type=Standard, CreateDate=09.11.2017, Family="Incremental Encoder", LatestRevisionDate=09.11.2017, Manufacturer Part Number=PEC11R-4220F-S0024, Mounted=Yes, PackageDescription="Standard Shaft Length 20.0 mm", Part Description="12 mm Incremental Encoder,  24 pulses, Push Momentary Switch", Part Number=EN_BOUNCE_PEC11R-4220F-S0024, Pin Count=5, SMD=No, Socket=No, Status=None
J1 J7: library part MOLEX_22-03-5045, "Connector 4 Male", Manufacturer=MOLEX, Manufacturer Part Number=22-27-2041, Author=DEL, ComponentHeight=5.9mm, Component Type=Standard, CreateDate=21.10.2017, Family=SPOX, LatestRevisionDate=21.10.2017, Mounted=Yes, Part Description="2.50mm Pitch SPOX Wire-to-Board Header, Vertical, Shrouded, 4 Circuits, Tin (Sn) Plating", Part Number=MOLEX_22-03-5045, Pin Count=4, SMD=No, Socket=No, Status=None
J2 J3: library part 3M_2304-6111-TG, "Connector 4 Male", Manufacturer=3M, Author=DEL, ComponentHeight=8.4mm, Component Type=Standard, CreateDate=2018-09-13, Family="Header 4", LatestRevisionDate=2018-09-13, Manufacturer Part Number=3M_2304-6111-TG, Mounted=Yes, Part Description="4 Contacts - Vertival Contacts Straight Strip Header Pitch 2.54", Part Number=3M_2304-6111-TG, Pin Count=4, SMD=No, Socket=No, Status=None
J4: library part 3M_2302-6111-TG, "Connector 2 Male", Manufacturer=3M, Author=DEL, ComponentHeight=8.4mm, Component Type=Standard, CreateDate=2018-09-13, Family="Header 2", LatestRevisionDate=2018-09-13, Manufacturer Part Number=3M_2302-6111-TG, Mounted=Yes, Part Description="2 Contacts - Horizontal Contacts Straight Strip Header Pitch 2.54", Part Number=3M_2302-6111-TG, Pin Count=2, SMD=No, Socket=No, Status=None
J5 J6: library part 3M_955114-6102-AR, "Connector 14 Female", Manufacturer=3M, Manufacturer Part Number=955114-6102-AR, Author=DEL, ComponentHeight=4.3mm, Component Type=Standard, CreateDate=02.11.2017, Family="Socket 14", LatestRevisionDate=02.11.2017, Mounted=Yes, Part Description="14 Contacts - 2mm x 2 mm Straight, Boardmount Socket, 950 Serie", Part Number=3M_955114-6102-AR, Pin Count=14, SMD=No, Socket=No, Status=None
L1: library part IND1008_2.2UH_20%_TDK_MLP2520S2R2MT0S1, "Inductor", Case=1008, Manufacturer=TDK, Manufacturer Part Number=MLP2520S2R2MT0S1, Power=1.2A, Resistance=0.117R, Tolerance=±20%, Author=ELMAN, ComponentHeight=1mm, Component Type=Standard, CreateDate=02.02.2016, HelpURL=C:\eftek\library\doc\DS_SPICE\capacitors\TDK\inductor_commercial_power_mlp2520_en.pdf, LatestRevisionDate=02.02.2016, Mounted=Yes, Part Description="SMT Inductors", Part Number=IND1008_2.2UH_20%_TDK_MLP2520S2R2MT0S1, Pin Count=2, SMD=Yes, Socket=No, Status=None
LD1: library part LED_OF-SMD1608R, "LED 1C 2A", Case=0603, Manufacturer=OPTOFLASH, Manufacturer Part Number=OF-SMD1608R, Author=ELMAN, Color=Red, ComponentHeight=0.8mm, Component Type=Standard, CreateDate=27.08.2015, LatestRevisionDate=27.08.2015, Mounted=Yes, PackageDescription="Chip Red LED, 2-Leads, Body 1.6x0.8mm, IPC Medium Density", Part Description="Surface Mount Red LED (0603 Case)", Part Number=LED_OF-SMD1608R, Pin Count=2, SMD=Yes, Socket=No
LD2: library part LED_OF-SMD1608B, "LED 1C 2A", Case=0603, Manufacturer=OPTOFLASH, Manufacturer Part Number=OF-SMD1608B, Author=DEL, Color=Blue, ComponentHeight=0.8mm, Component Type=Standard, CreateDate=11.12.2017, LatestRevisionDate=11.12.2017, Mounted=Yes, PackageDescription="Chip Blue LED, 2-Leads, Body 1.6x0.8mm, IPC Medium Density", Part Description="Surface Mount Red LED (0603 Case)", Part Number=LED_OF-SMD1608B, Pin Count=2, SMD=Yes, Socket=No
LD3: library part LED_OF-SMD1608Y, "LED 1C 2A", Case=0603, Manufacturer=OPTOFLASH, Manufacturer Part Number=OF-SMD1608R, Author=DEL, Color=Yellow, ComponentHeight=0.8mm, Component Type=Standard, CreateDate=11.12.2017, LatestRevisionDate=11.12.2017, Mounted=Yes, PackageDescription="Chip Yellow LED, 2-Leads, Body 1.6x0.8mm, IPC Medium Density", Part Description="Surface Mount Red LED (0603 Case)", Part Number=LED_OF-SMD1608Y, Pin Count=2, SMD=Yes, Socket=No
LD4: library part LED_OF-SMD1608G, "LED 1C 2A", Case=0603, Manufacturer=OPTOFLASH, Manufacturer Part Number=OF-SMD1608G, Author=ELMAN, Color=Green, ComponentHeight=0.8mm, Component Type=Standard, CreateDate=27.08.2015, LatestRevisionDate=27.08.2015, Mounted=Yes, PackageDescription="Chip Green LED, 2-Leads, Body 1.6x0.8mm, IPC Medium Density", Part Description="Surface Mount Green LED (0603 Case)", Part Number=LED_OF-SMD1608G, Pin Count=2, SMD=Yes, Socket=No
LS1: library part HPS13C, "Piezo Sounder", Manufacturer="JL WORLD", Author=DEL, ComponentHeight=1.2mm, Component Type=Standard, CreateDate=10.11.2017, Family=Piezo, LatestRevisionDate=10.11.2017, Manufacturer Part Number=HPS13C, Mounted=Yes, Output=">= 80 dB", PackageDescription="12.8 x 12.8 x 2.5 mm", Part Description="Piezo sound generator", Part Number=HPS13C, Pin Count=2, SMD=Yes, Socket=No
PB1 PB2 PB3 PB4 PB5 PB6: library part PB_E-SWITCH_TL1105HF100Q, "Push-Button Switch SPDT", Manufacturer=E-SWITCH, Manufacturer Part Number=TL3305AF260QG, Author=DEL, ComponentHeight=3.8mm, Component Type=Standard, CreateDate=06.11.2017, Family="Push Button", LatestRevisionDate=07.11.2017, Mounted=Yes, PackageDescription="6mm x 6mm Body, Surface Mount Tactile Switches", Part Description="12VDC 50mA SPST Tactile  Push-Button Switch", Part Number=PB_E-SWITCH_TL1105HF100Q, Pin Count=4, SMD=Yes, Socket=No, Status=None
R1 R2 R4 R5 R13: library part R0402_100R_1%_0.0625W_100PPM, "Resistor - 1%", Case=0402, Manufacturer=GENERIC, Manufacturer1 ComponentHeight=0.4mm, Manufacturer1 Example=PHYCOMP, Manufacturer1 Part Number=232270671001, Power=0.0625W, Tolerance=±1%, Author="CERN DEM JLC", Component Type=Standard, CreateDate=03.12.2007, HelpURL=\\cern.ch\dfs\Applications\Altium\Datasheets\R0402_Phycomp_RC0402.pdf, LatestRevisionDate=13.03.2008, Manufacturer Part Number=R0402_100R_1%_0.0625W_100PPM, Mounted=Yes, Part Description="General Purpose Thick Film Chip Resistor", Part Number=R0402_100R_1%_0.0625W_100PPM, Pin Count=2, SMD=Yes, Socket=No, Status="Not recommended", TC=±100ppm/°C
R3 R9 R14: library part R0402_1K_1%_0.0625W_100PPM, "Resistor - 1%", Case=0402, Manufacturer=GENERIC, Manufacturer1 ComponentHeight=0.4mm, Manufacturer1 Example=PHYCOMP, Manufacturer1 Part Number=232270671002, Power=0.0625W, Tolerance=±1%, Author="CERN DEM JLC", Component Type=Standard, CreateDate=03.12.2007, HelpURL=\\cern.ch\dfs\Applications\Altium\Datasheets\R0402_Phycomp_RC0402.pdf, LatestRevisionDate=13.03.2008, Manufacturer Part Number=R0402_1K_1%_0.0625W_100PPM, Mounted=Yes, Part Description="General Purpose Thick Film Chip Resistor", Part Number=R0402_1K_1%_0.0625W_100PPM, Pin Count=2, SMD=Yes, Socket=No, Status="Not recommended", TC=±100ppm/°C
R6 R7 R16: library part R0402_2K_1%_0.0625W_100PPM, "Resistor - 1%", Case=0402, Manufacturer=GENERIC, Manufacturer1 ComponentHeight=0.4mm, Manufacturer1 Example=PHYCOMP, Manufacturer1 Part Number=232270672002, Power=0.0625W, Tolerance=±1%, Author="CERN DEM JLC", Component Type=Standard, CreateDate=03.12.2007, HelpURL=\\cern.ch\dfs\Applications\Altium\Datasheets\R0402_Phycomp_RC0402.pdf, LatestRevisionDate=13.03.2008, Manufacturer Part Number=R0402_2K_1%_0.0625W_100PPM, Mounted=Yes, Part Description="General Purpose Thick Film Chip Resistor", Part Number=R0402_2K_1%_0.0625W_100PPM, Pin Count=2, SMD=Yes, Socket=No, Status="Not recommended", TC=±100ppm/°C
R8 R23: library part R0402_270R_1%_0.0625W_100PPM, "Resistor - 1%", Case=0402, Manufacturer=GENERIC, Manufacturer1 ComponentHeight=0.4mm, Manufacturer1 Example=PHYCOMP, Manufacturer1 Part Number=232270672701, Power=0.0625W, Tolerance=±1%, Author="CERN DEM JLC", Component Type=Standard, CreateDate=2007-12-03, HelpURL=\\cern.ch\dfs\Applications\Altium\Datasheets\R0402_Phycomp_RC0402.pdf, LatestRevisionDate=2008-03-13, Manufacturer Part Number=R0402_270R_1%_0.0625W_100PPM, Mounted=Yes, Part Description="General Purpose Thick Film Chip Resistor", Part Number=R0402_270R_1%_0.0625W_100PPM, Pin Count=2, SMD=Yes, Socket=No, Status="Not recommended", TC=±100ppm/°C
R10 R11 R12: library part R0402_10R_1%_0.0625W_200PPM, "Resistor - 1%", Case=0402, Manufacturer=GENERIC, Manufacturer1 ComponentHeight=0.4mm, Manufacturer1 Example=PHYCOMP, Manufacturer1 Part Number=232270671009, Power=0.0625W, Tolerance=±1%, Author="CERN DEM JLC", Component Type=Standard, CreateDate=24.06.2009, HelpURL=\\cern.ch\dfs\Applications\Altium\Datasheets\R0402_Phycomp_RC0402.pdf, LatestRevisionDate=13.03.2008, Manufacturer Part Number=R0402_10R_1%_0.0625W_200PPM, Mounted=Yes, Part Description="General Purpose Thick Film Chip Resistor", Part Number=R0402_10R_1%_0.0625W_200PPM, Pin Count=2, SMD=Yes, Socket=No, Status="Not recommended", TC=±200ppm/°C
R15: library part R0402_1K5_1%_0.0625W_100PPM, "Resistor - 1%", Case=0402, Manufacturer=GENERIC, Manufacturer1 ComponentHeight=0.4mm, Manufacturer1 Example=PHYCOMP, Manufacturer1 Part Number=232270671502, Power=0.0625W, Tolerance=±1%, Author="CERN DEM JLC", Component Type=Standard, CreateDate=03.12.2007, HelpURL=\\cern.ch\dfs\Applications\Altium\Datasheets\R0402_Phycomp_RC0402.pdf, LatestRevisionDate=13.03.2008, Manufacturer Part Number=R0402_1K5_1%_0.0625W_100PPM, Mounted=Yes, Part Description="General Purpose Thick Film Chip Resistor", Part Number=R0402_1K5_1%_0.0625W_100PPM, Pin Count=2, SMD=Yes, Socket=No, Status="Not recommended", TC=±100ppm/°C
R17: library part R0402_12K_1%_0.0625W_100PPM, "Resistor - 1%", Case=0402, Manufacturer=GENERIC, Manufacturer1 ComponentHeight=0.4mm, Manufacturer1 Example=PHYCOMP, Manufacturer1 Part Number=232270671203, Power=0.0625W, Tolerance=±1%, Author="CERN DEM JLC", Component Type=Standard, CreateDate=03.12.2007, HelpURL=\\cern.ch\dfs\Applications\Altium\Datasheets\R0402_Phycomp_RC0402.pdf, LatestRevisionDate=13.03.2008, Manufacturer Part Number=R0402_12K_1%_0.0625W_100PPM, Mounted=Yes, Part Description="General Purpose Thick Film Chip Resistor", Part Number=R0402_12K_1%_0.0625W_100PPM, Pin Count=2, SMD=Yes, Socket=No, Status="Not recommended", TC=±100ppm/°C
R18 R19 R20 R21: library part R0402_49R9_1%_0.0625W_100PPM, "Resistor - 1%", Case=0402, Manufacturer=GENERIC, Manufacturer1 ComponentHeight=0.4mm, Manufacturer1 Example=PHYCOMP, Manufacturer1 Part Number=232270674702, Power=0.0625W, Tolerance=±1%, Author=ELMAN, Component Type=Standard, CreateDate=20.05.2015, HelpURL=\\cern.ch\dfs\Applications\Altium\Datasheets\R0402_Phycomp_RC0402.pdf, LatestRevisionDate=20.05.2015, Manufacturer Part Number=R0402_49R9_1%_0.0625W_100PPM, Mounted=Yes, Part Description="General Purpose Thick Film Chip Resistor", Part Number=R0402_49R9_1%_0.0625W_100PPM, Pin Count=2, SMD=Yes, Socket=No, Status="Not recommended", TC=±100ppm/°C
R22: library part R0402_4K7_1%_0.0625W_100PPM, "Resistor - 1%", Case=0402, Manufacturer=GENERIC, Manufacturer1 ComponentHeight=0.4mm, Manufacturer1 Example=PHYCOMP, Manufacturer1 Part Number=232270674702, Power=0.0625W, Tolerance=±1%, Author="CERN DEM JLC", Component Type=Standard, CreateDate=2007-12-03, HelpURL=\\cern.ch\dfs\Applications\Altium\Datasheets\R0402_Phycomp_RC0402.pdf, LatestRevisionDate=2008-03-13, Manufacturer Part Number=R0402_4K7_1%_0.0625W_100PPM, Mounted=Yes, Part Description="General Purpose Thick Film Chip Resistor", Part Number=R0402_4K7_1%_0.0625W_100PPM, Pin Count=2, SMD=Yes, Socket=No, Status="Not recommended", TC=±100ppm/°C
SK1: library part EEMB_BH500, "Battery holder", Manufacturer=EEMB, Author=DEL, ComponentHeight=4mm, Component Type=Standard, CreateDate=22.10.2017, Device=BH500, LatestRevisionDate=22.10.2017, Manufacturer Part Number=BH500, Mounted=Yes, Part Description="Battery holder for CR and LIR series1216 to 1220,1225", Part Number=EEMB_BH500, Pin Count=2, SMD=Yes, Socket=No, Status=None
T1: library part XFMR_LF-H84P-1, "Signal Transformers 10/100 Base-T XFMR 1 Port LAN", Manufacturer=LANKom, Part Number=PE-68678, Author=DEL, ComponentHeight=2mm, Component Type=Standard, CreateDate=10.10.2017, LatestRevisionDate=10.10.2017, Manufacturer Part Number=LF-H84P-1, Mounted=Yes, Part Description="10/100BASE-Tx PC Card LAN Magnetics Module", Pin Count=16, SMD=No, Socket=No, Status=None
TP1 TP2 TP3 TP4 TP5 TP6 TP7: library part TP_SMD_0.8MM, Author=DEL, ComponentHeight=0mm, Component Type="Standard (No BOM)", CreateDate=14.11.2017, Family="Test Point", LatestRevisionDate=14.11.2017, Mounted=No, PackageDescription="0.8mm round SMD Pad", Part Description="0.8mm round SMD Pad", Part Number=TP_SMD_0.8MM, Pin Count=1, SMD=No, Socket=No, Status=None
U1: library part NUP4202W1, "ESD Protection Diode, Low  Clamping Voltage", Case=SOT363, Manufacturer="ON SEMICONDUCTOR", Manufacturer Part Number=NUP4202W1T2G, Author=DEL, ComponentHeight=1.1mm, Component Type=Standard, CreateDate=10.11.2017, Device=NUP4202, LatestRevisionDate=10.11.2017, Mounted=Yes, PackageDescription="SOT363, 0.65mm pitch; 6 pin, 1.25mm W X 2mm L, IPC Medium Density", Part Description="ESD Protection Diode, Low  Clamping Voltage", Part Number=NUP4202W1, Pin Count=6, SMD=Yes, Socket=No
U2: library part 24AA08T-I/OT, "I2C™ Serial EEPROM SOT23-5 Package", Case=SOT23-5, Manufacturer=MICROCHIP, Author=DEL, ComponentHeight=1.45mm, Component Type=Standard, CreateDate=09.11.2017, Device=24AA08, LatestRevisionDate=09.11.2017, Manufacturer Part Number=24AA08T-I/OT, Mounted=Yes, PackageDescription="SOT, 0.95mm pitch; 5 pin, 1.60mm W X 2.90mm L X 1.45mm H body, IPC Medium Density", Part Description="8K Serial EEPROM", Part Number=24AA08T-I/OT, Pin Count=5, SMD=Yes, Socket=No
U3: "3-Terminal Regulator 1=Adj 2=OUT 3=IN 4=OUT", Case=TO-263, Manufacturer="TEXAS INSTRUMENTS", Author=D_EL, ComponentHeight=4.64mm, Component Type=Standard, CreateDate=20.10.2017, Device=LM1086IS-3.3, LatestRevisionDate=20.10.2017, Manufacturer Part Number=LM1086IS-3.3, Mounted=Yes, PackageDescription="TO-263, TO, 2.54mm pitch; 3 pin,14.35mm L X 8.64mm W X 4.64mm H body IPC Medium Density", Part Description="3.3V 1.5A Low Dropout Positive Regulators", Part Number=LM1086IS-3.3, Pin Count=4, SMD=Yes, Socket=No
U4: library part LAN8720A-CP-TR, Case=QFN24, Manufacturer=Microchip, Author=DEL, ComponentHeight=1mm, Component Type=Standard, CreateDate=10.08.2017, Device=LAN8720, LatestRevisionDate=11.10.2017, Manufacturer Part Number=LAN8720A-CP-TR, Mounted=Yes, PackageDescription="QFN,0.50mm pitch,square;6 pin X 6 pin,4.0mm X 4.0mm X 1.00mm H body (w/thermal tab 2.65 X 2.65mm)", Part Description="Small Footprint RMII 10/100 Ethernet Transceiver with HP Auto-MDIX Support", Part Number=LAN8720A-CP-TR, Pin Count=25, SMD=Yes, Socket=No
U5: "ARM Cortex-M4 32b MCU+FPU, 210DMIPS, up to 1MB Flash/192+4KB RAM, USB OTG HS/FS, Ethernet, 17 TIMs, 3 ADCs, 15 comm. interfaces & camera", Case=LQFP100, Manufacturer="ST Microelectronics", Author=DEL, ComponentHeight=1.6mm, Component Type=Standard, CreateDate=11.10.2017, Device=STM32F407VET6, LatestRevisionDate=11.10.2017, Manufacturer Part Number=STM32F407VET6, Mounted=Yes, PackageDescription="QFP, 0.50mm Pitch, Square; 100 Pin,14.00mm L X 14.00mm W X 1.60mm H Body", Part Description="ARM Cortex-M4 32b MCU+FPU, 210DMIPS, up to 1MB Flash/192+4KB RAM, USB OTG HS/FS, Ethernet, 17 TIMs, 3 ADCs, 15 comm. interfaces & camera", Part Number=STM32F407VET6, Pin Count=100, SMD=Yes, Socket=No
X1: library part 32.768KHz_KX–327NHT, "Quartz Crystal", Manufacturer=GEYER, Manufacturer Part Number=KX–327NHT, Author=D_EL, ComponentHeight=0.8mm, Component Type=Standard, CreateDate=15.06.2017, LatestRevisionDate=15.06.2017, Mounted=Yes, PackageDescription="2 pin, 3.20mm L X 1.50mm W X 0.80mm H", Part Description="Quartz Crystal ±20ppm", Part Number=32.768KHz_KX–327NHT, Pin Count=2, SMD=Yes, Socket=No
X2: library part 24MHZ_XRCGB24M000F3M00R0, "Crystal 4 pins 1=XTAL 2=GND3=XTAL 4=GND", Manufacturer=MURATA, Manufacturer Part Number=7XRCGB24M000F3M00R0, Author=D_EL, ComponentHeight=0.7mm, Component Type=Standard, CreateDate=17.06.2017, LatestRevisionDate=17.06.2017, Mounted=Yes, PackageDescription="Oscillator, corner concave; 4 pin, 2.00mm L X 1.60mm W X 0.65mm H, IPC Medium Density", Part Description="± 30ppm at (25±3°C), -30°C to +85°C, 6pF, Ceramic SMD Crystal, Type HCR2016", Part Number=24MHZ_XRCGB24M000F3M00R0, Pin Count=4, SMD=Yes, Socket=No

## Free pads (board coordinates)
  round 6 hole 3.2: MH1(15.5,32.5) MH2(15.5,3.5) MH3(98.5,32.5) MH4(98.5,3.5)

## Via types
v1: diameter 0.7, hole 0.3, Top Layer to Bottom Layer, tented both sides, 83 vias

## Nets (pads, with @x,y where several pads share a name; then routed paths per layer and width w, separated by ;. In a path a pad name is that pad's centre, name@x,y a point inside that pad or via, vN(x,y) a via of type N, cw(c..) or ccw(c..) an arc to the next point about the centre after c; other vN are vias at no path point)
0V: C1.1 C2.1 C3.1 C4.1 C5.1 C6.1 C7.2 C8.1 C9.1 C10.1 C11.1 C12.2 C13.1 C14.1 C15.1 C16.1 C17.1 C18.2 C19.2 C20.1 C21.1 C22.1 C23.1 C24.1 C25.1 C26.1 C27.1 C28.1 C29.1 C30.1 C31.1 EN1.S1 EN1.SH1 EN1.SH2 J1.1 J2.3 J3.3 J5.10 J6.13 J6.14 LD4.1 PB1.1 PB1.2 PB2.1 PB2.2 PB3.1 PB3.2 PB4.1 PB4.2 PB5.1 PB5.2 PB6.1 PB6.2 R3.2 R4.1 R9.2 R14.2 R17.2 SK1.2 U1.2 U2.2 U2.5 U3.1 U4.25 U5.10 U5.20 U5.27 U5.37 U5.74 U5.99 X2.2 X2.4 | length 14
  Top Layer w0.25: X2.2 47.075,22.5 v1(47.25,22.5) ; U5.20 v1(51.25,19.5) ; U5.10 51,24.5 v1(51.25,24.75) ; U5.27 51.975,15.325 51.975,16.725 v1(52,16.75) ; U5.99 52,29.5 v1(52.25,29.25) ; v1(63.75,28.5) U5.74
  Bottom Layer w0.25: v1(51.25,19.5) C23.1@51.95,19.5 ; v1(51.25,24.75) C22.1@51.95,24.75 ; v1(52,16.75) C25.1@52,17.45 ; C28.1 52.25,28.55 v1(52.25,29.25) ; LD4.1 59.45,10.71 v1@59.995,11.255 ; C27.1 v1(63.75,28.5)
  other v1: 57.5,6.25 52.75,7.75 51.25,8.5 55.25,8.5 55,11.25 56,11.25 60,11.25 86.75,11.75 56,13.25 50.25,13.75 52.25,13.75 37.25,14 6.491,14.711 66,15.5 37.25,16 42.75,21.25 48.25,24.25 42.75,25.25 45,25.25 41.25,30.5 45.75,30.5 45.75,32.25 43.75,33.5
+3.3V: C2.2 C3.2 C7.1 C20.2 C21.2 C22.2 C23.2 C24.2 C25.2 C26.2 C27.2 C28.2 J2.1 J3.1 J4.1 J5.9 J6.1 L1.2 LD1.2 R6.2 R7.2 R15.2 R16.2 U2.4 U3.2 U3.4 U4.9 U5.11 U5.19 U5.21 U5.22 U5.28 U5.50 U5.75 U5.100 | length 120.6
  Top Layer w0.25: R6.2 42.5,31 42.75,30.75 43.5,30.75 ; R7.2 43.5,30.75 ; U2.4@44.8,30.65 44.8,29.75 44.75,29.7 ; U5.22 v1@51,18.5 ; U5.21 50.5,19 v1@51,18.5 ; U5.19 50.795,20 51.127,20.332 v1(51.127,20.557) ; U5.11 51,24 v1(51.25,23.75) ; R16.2 v1(51,11.25) ; v1(51.25,18.5) v1@51,18.5 ; U5.100 51.5,29.5 v1(51.25,29.25) 50.8,29.7 44.75,29.7 ; U5.28 52.5,16.25 v1(53,16.75) ; v1(53.5,6.75) 54.318,6.75 54.543,6.525 55.525,6.525 U4.9 ; U5.50 v1(63.5,16.75) ; 64,29.25 64.25,29 U5.75 66.5,29 66.75,29.25 66.75,30.75 67.375,31.375 72.625,31.375 73.25,30.75 73.25,29.75 74.25,28.75 77,28.75 ; C2.2 76.95,26.95 J4.1 77,30.07 76.91,30.16 J3.1 J2.1 ; 43.5,30.75 43.45,30.7 C3.2 44.2,30 44.5,29.7 44.75,29.7
  Bottom Layer w0.25: C7.1 28.15,15 J5.9 39,15 39.75,15.75 52,15.75 v1(53,16.75) ; v1(51.127,20.557) C23.2@51.893,20.557 ; v1(51.25,18.5) C24.2 ; v1(51.25,23.75) C22.2@51.95,23.75 ; v1(51.25,29.25) 51.25,28.55 C28.2 ; R15.2 L1.2@54,4.95 ; C25.2@53,17.45 v1(53,16.75) ; L1.2 54.2,6.5 C20.2 v1(53.5,6.75) 53.5,8.75 v1(51,11.25) 51,14 53,16 v1(53,16.75) ; C21.2 v1(57.75,25) ; LD1.2 59.5,16.05 v1(59.5,17) ; v1(62,29.25) 62.05,29.2 C27.2 ; v1(63.5,16.75) C26.2 ; J3.1 78.25,30.25 79,31 J6.1
  Bottom Layer w0.35: U3.2 U3.4@20.1,18 ; U3.4@22.95,15.15 C7.1
+12V: D1.2 J1.4 | length 15.8
  Bottom Layer w0.35: J1.4 5.241,21.711 6.359,22.829 ; 6.359,22.868 12.118,22.868 12.618,23.368 12.618,26.368 13.75,27.5 D1.2
B_DOWN: PB6.3 PB6.4 U5.61 | length 81.7
  Top Layer w0.25: U5.61 78.773,22 79.9,23.127 79.9,32.627 80.873,33.6 84.173,33.6 85.15,32.623 85.15,23.123 85.973,22.3 94.8,22.3 96.75,24.25 102.75,24.25 103.75,23.25 103.75,11.385 104.885,10.25 PB6.4 PB6.3
B_MODE: PB1.3 PB1.4 U5.4 | length 70.2
  Top Layer w0.25: PB1.3 PB1.4 8.75,19.1 9.25,18.6 22.564,18.6 24.2,20.236 24.2,27.55 v1(23.75,28) ; v1(27.25,28) 26.95,28.3 26.95,31.95 27.5,32.5 34.341,32.5 38.941,27.9 47.85,27.9 48.25,27.5 U5.4
  Bottom Layer w0.25: v1(23.75,28) v1(27.25,28)
B_NEXT: PB4.3 PB4.4 U5.2 | length 56.4
  Top Layer w0.25: PB4.3 PB4.4 22.25,15.741 26,19.491 26,32.273 27.127,33.4 34.714,33.4 39.314,28.8 48.223,28.8 48.523,28.5 U5.2
B_ONOFF: PB2.3 PB2.4 U5.1 | length 70
  Top Layer w0.25: PB2.4 PB2.3 8.75,11.75 9.75,12.75 9.75,16.719 10.255,17.223 23.096,17.223 25.55,19.677 25.55,32.459 26.941,33.85 34.9,33.85 39.5,29.25 48.409,29.25 48.659,29 U5.1
B_UP: PB5.3 PB5.4 U5.62 | length 69.2
  Top Layer w0.25: U5.62 78.636,22.5 79.45,23.314 79.45,32.814 80.686,34.05 84.359,34.05 85.6,32.809 85.6,23.309 86.159,22.75 94.614,22.75 96.564,24.7 105.2,24.7 PB5.3@106.15,25.65 ; PB5.3 PB5.4
B_VIEW: PB3.3 PB3.4 U5.3 | length 40.5
  Top Layer w0.25: PB3.4 27,25.75 26.5,26.25 26.5,32.136 27.314,32.95 34.527,32.95 39.127,28.35 48.036,28.35 48.386,28 U5.3
  Bottom Layer w0.25: PB3.3 PB3.4
B_ZERO: EN1.S2 U5.63 | length 52.4
  Top Layer w0.25: U5.63 78.5,23 79,23.5 79,33 80.5,34.5 84.546,34.5 86.05,32.996 86.05,23.496 86.296,23.25 94.477,23.25 95,23.773 EN1.S2
BOOT0: J4.2 R3.1 U5.94 | length 29.1
  Top Layer w0.25: v1(54.5,29.25) U5.94 ; v1(70.25,24.5) 70.25,25.165 72.085,27 J4.2 74.45,26.99 R3.1
  Bottom Layer w0.25: v1(54.5,29.25) 57,31.75 61.911,31.75 67.865,25.796 69.777,25.796 70.25,25.323 v1(70.25,24.5)
CAN1_RX: TP7.1 U5.81 | length 3
  Top Layer w0.25: U5.81 61,32.25 61.5,32.75 TP7.1
CAN1_TX: TP6.1 U5.82 | length 3
  Top Layer w0.25: TP6.1 60,32.75 60.5,32.25 U5.82
CON_RX: J1.2 R1.1 | length 4.9
  Top Layer w0.25: J1.2 5.316,18.101 5.316,20.286 5.441,20.411 R1.1
CON_TX: J1.3 R2.1 | length 4.8
  Top Layer w0.25: J1.3 4.866,20.151 4.866,20.836 5.066,21.036 6.991,21.036 R2.1
ETH_CRS_DV: R12.1 U5.32 | length 5.9
  Top Layer w0.25: R12.1 52,11.023 53.1,12.123 53.1,12.873 54.5,14.273 U5.32
ETH_MDC: U4.13 U5.16 | length 24.3
  Top Layer w0.25: v1(47.75,21) 48.225,21.475 49.775,21.475 U5.16 ; v1(48.5,18.75) 48.05,18.3 48.05,14.223 49.75,12.523 49.75,8.273 53.723,4.3 U4.13
  Bottom Layer w0.25: v1(47.75,21) 47.75,20.25 48.5,19.5 v1(48.5,18.75)
ETH_MDIO: R16.1 U4.12 U5.25 | length 18
  Top Layer w0.25: U5.25 48.75,17 48.5,16.75 48.5,14.409 50.2,12.709 50.2,9.5 ; R16.1 50.25,9.55 50.2,9.5 ; U4.12 53.659,5 50.2,8.459 50.2,9.5
ETH_REF_CLK: R13.1 TP2.1 U5.24 U5.66 | length 43.6
  Top Layer w0.25: U5.24 50.647,17.5 51,17.147 51,13.5 v1(52.25,12.25) ; v1(54.75,12.25) 57,12.25 ; R13.1 57,12.25 ; v1(63.5,20) 63.5,24.25 63.75,24.5 U5.66 68.5,24.5 TP2.1 ; v1(67.75,17.25) 67.75,15.9 65.175,13.325 63.075,13.325 62,12.25 57,12.25
  Bottom Layer w0.25: v1(52.25,12.25) v1(54.75,12.25) ; v1(63.5,20) 66.5,20 67.75,18.75 v1(67.75,17.25)
ETH_RXD0: R10.1 U5.33 | length 5.7
  Top Layer w0.25: R10.1 53,11.386 53.55,11.936 53.55,12.686 55,14.136 U5.33
ETH_RXD1: R11.1 U5.34 | length 5.5
  Top Layer w0.25: R11.1 54,12.5 55.5,14 U5.34
ETH_TXD0: U4.17 U5.51 | length 26.3
  Top Layer w0.25: v1(58.25,1.75) U4.17 ; U5.51 66,17 v1(66.75,16.25)
  Bottom Layer w0.25: v1(58.25,1.75) 63.523,1.75 65.15,3.377 65.15,16 65.4,16.25 v1(66.75,16.25)
ETH_TXD1: U4.18 U5.52 | length 24.9
  Top Layer w0.25: U4.18 58.75,3.25 59,3 v1(59,2.5) ; U5.52 66.5,17.5 v1(66.75,17.25)
  Bottom Layer w0.25: v1@59.1,2.5 59.35,2.25 63.386,2.25 64.7,3.564 64.7,16.186 65.214,16.7 66.2,16.7 v1(66.75,17.25)
ETH_TXEN: U4.16 U5.48 | length 22.6
  Top Layer w0.25: v1(57.5,2.5) 57.75,2.75 U4.16 ; U5.48 62.5,14.25 62.75,14 v1(64,14)
  Bottom Layer w0.25: v1(57.5,2.5) 57.545,2.5 57.795,2.75 58.325,2.75 58.325,2.78 58.72,3.175 59.28,3.175 59.675,2.78 59.675,2.75 63.25,2.75 64.25,3.75 64.25,13.75 v1(64,14)
GP_ETH_NINT: U4.14 U5.18 | length 24.8
  Top Layer w0.25: U5.18 48.841,20.5 47.6,19.259 47.6,14.036 49.3,12.336 49.3,8.086 53.936,3.45 56.7,3.45 56.75,3.5 U4.14
GP_ETH_NRST: R15.1 U4.15 U5.17 | length 28.2
  Top Layer w0.25: U5.17 48.705,21 47.15,19.445 47.15,13.85 48.85,12.15 48.85,7.9 53,3.75 v1(53,3.25) 53.5,3.25 53.75,3 56.886,3 57.25,3.364 U4.15
  Bottom Layer w0.25: v1(53,3.25) R15.1
GP_GP0: J6.10 U5.57 | length 22.7
  Top Layer w0.25: U5.57 79.773,20 80.95,18.823 80.95,15.547 81.25,15.247 81.25,14.275 J6.10
GP_GP1: J6.9 U5.58 | length 21.4
  Top Layer w0.25: U5.58 79.909,20.5 81.4,19.009 81.4,15.864 82.264,15 J6.9
I2C1_SCL: R6.1 U2.1 U5.95 | length 15.8
  Top Layer w0.25: R6.1 42.5,33.227 43.498,34.225 46.7,34.225 ; U2.1@46.7,33.35 46.7,34.225 ; U5.95 54,31.954 53.725,32.229 53.725,32.252 52.277,33.7 48.05,33.7 47.525,34.225 46.7,34.225
I2C1_SDA: R7.1 U2.3 U5.96 | length 14
  Top Layer w0.25: R7.1 44.8,32.5 ; U2.3@44.8,33.35 U2.3 44.8,32.5 ; U5.96 53.5,31.818 53.275,32.043 53.275,32.066 52.091,33.25 48.25,33.25 46.575,31.575 45.185,31.575 44.8,31.96 44.8,32.5
LCD_CS: J6.6 U5.87 | length 32
  Top Layer w0.25: U5.87 58,32.227 v1(58.261,32.489)
  Bottom Layer w0.25: v1(58.261,32.489) 58.261,32.511 58.925,33.175 61.825,33.175 68.3,26.7 70.391,26.7 72.875,24.216 72.875,24.211 73.136,23.95 80.391,23.95 81.25,23.091 81.25,22.275 J6.6
LCD_DC: J6.5 U5.88 | length 32
  Top Layer w0.25: U5.88 57.5,33 v1(57.75,33.25)
  Bottom Layer w0.25: v1(57.75,33.25) 58.125,33.625 62.011,33.625 68.486,27.15 70.577,27.15 73.327,24.4 81.125,24.4 J6.5
LCD_LED_PWM: J6.8 R5.1 | length 19
  Top Layer w0.25: R5.1 v1(71.75,23.75)
  Bottom Layer w0.25: v1(71.75,23.75) 72.45,23.05 80.018,23.05 80.35,22.718 80.35,21.4 80.949,20.801 80.949,19.422 81.397,18.975 81.397,18.128 J6.8
LCD_RST: J6.7 U5.86 | length 32.4
  Top Layer w0.25: U5.86 58.5,31.75 v1(59.25,32.5)
  Bottom Layer w0.25: v1(59.25,32.5) 59.43,32.68 61.684,32.68 68.114,26.25 70.205,26.25 72.425,24.03 72.425,24.025 72.95,23.5 80.204,23.5 80.8,22.904 80.8,21.59 81.399,20.991 81.399,20.101 82.5,19 J6.7
LED_ACT: R22.1 U4.3 | length 1.5
  Top Layer w0.25: U4.3 57.75,8.783 58,9.033 R22.1
LED_GP: LD2.2 U5.44 | length 2.9
  Top Layer w0.25: v1(60.5,13.5) U5.44
  Bottom Layer w0.25: LD2.2 v1(60.5,13.5)
LED_SPEED: R23.1 U4.2 | length 1.7
  Top Layer w0.25: U4.2 58.25,8.647 58.553,8.95 58.7,8.95 59,9.25 R23.1
NetC4_2: C4.2 D1.1 U3.3 | length 14
  Bottom Layer w0.35: U3.3 12.79,20.54 13.79,21.54 13.79,24.54 14.25,25 17.25,25 17.5,25.25 17.5,27.25 17.75,27.5 D1.1
NetC8_2: C8.2 C9.2 U4.6 | length 2.5
  Top Layer w0.25: C8.2 C9.2 56,9 56.25,8.75 U4.6
NetEN1_C: EN1.C R4.2 | length 8.2